# Altium PCB BluesClues.PcbDoc
Units mil, origin at the board's own origin, x right, y up, seen from the top; angles counter-clockwise.
Board outline 4000 x 4000 mil, 2 copper layers (Top Layer, Bottom Layer); 33 components, 32 nets, 131 pads, 212 vias.
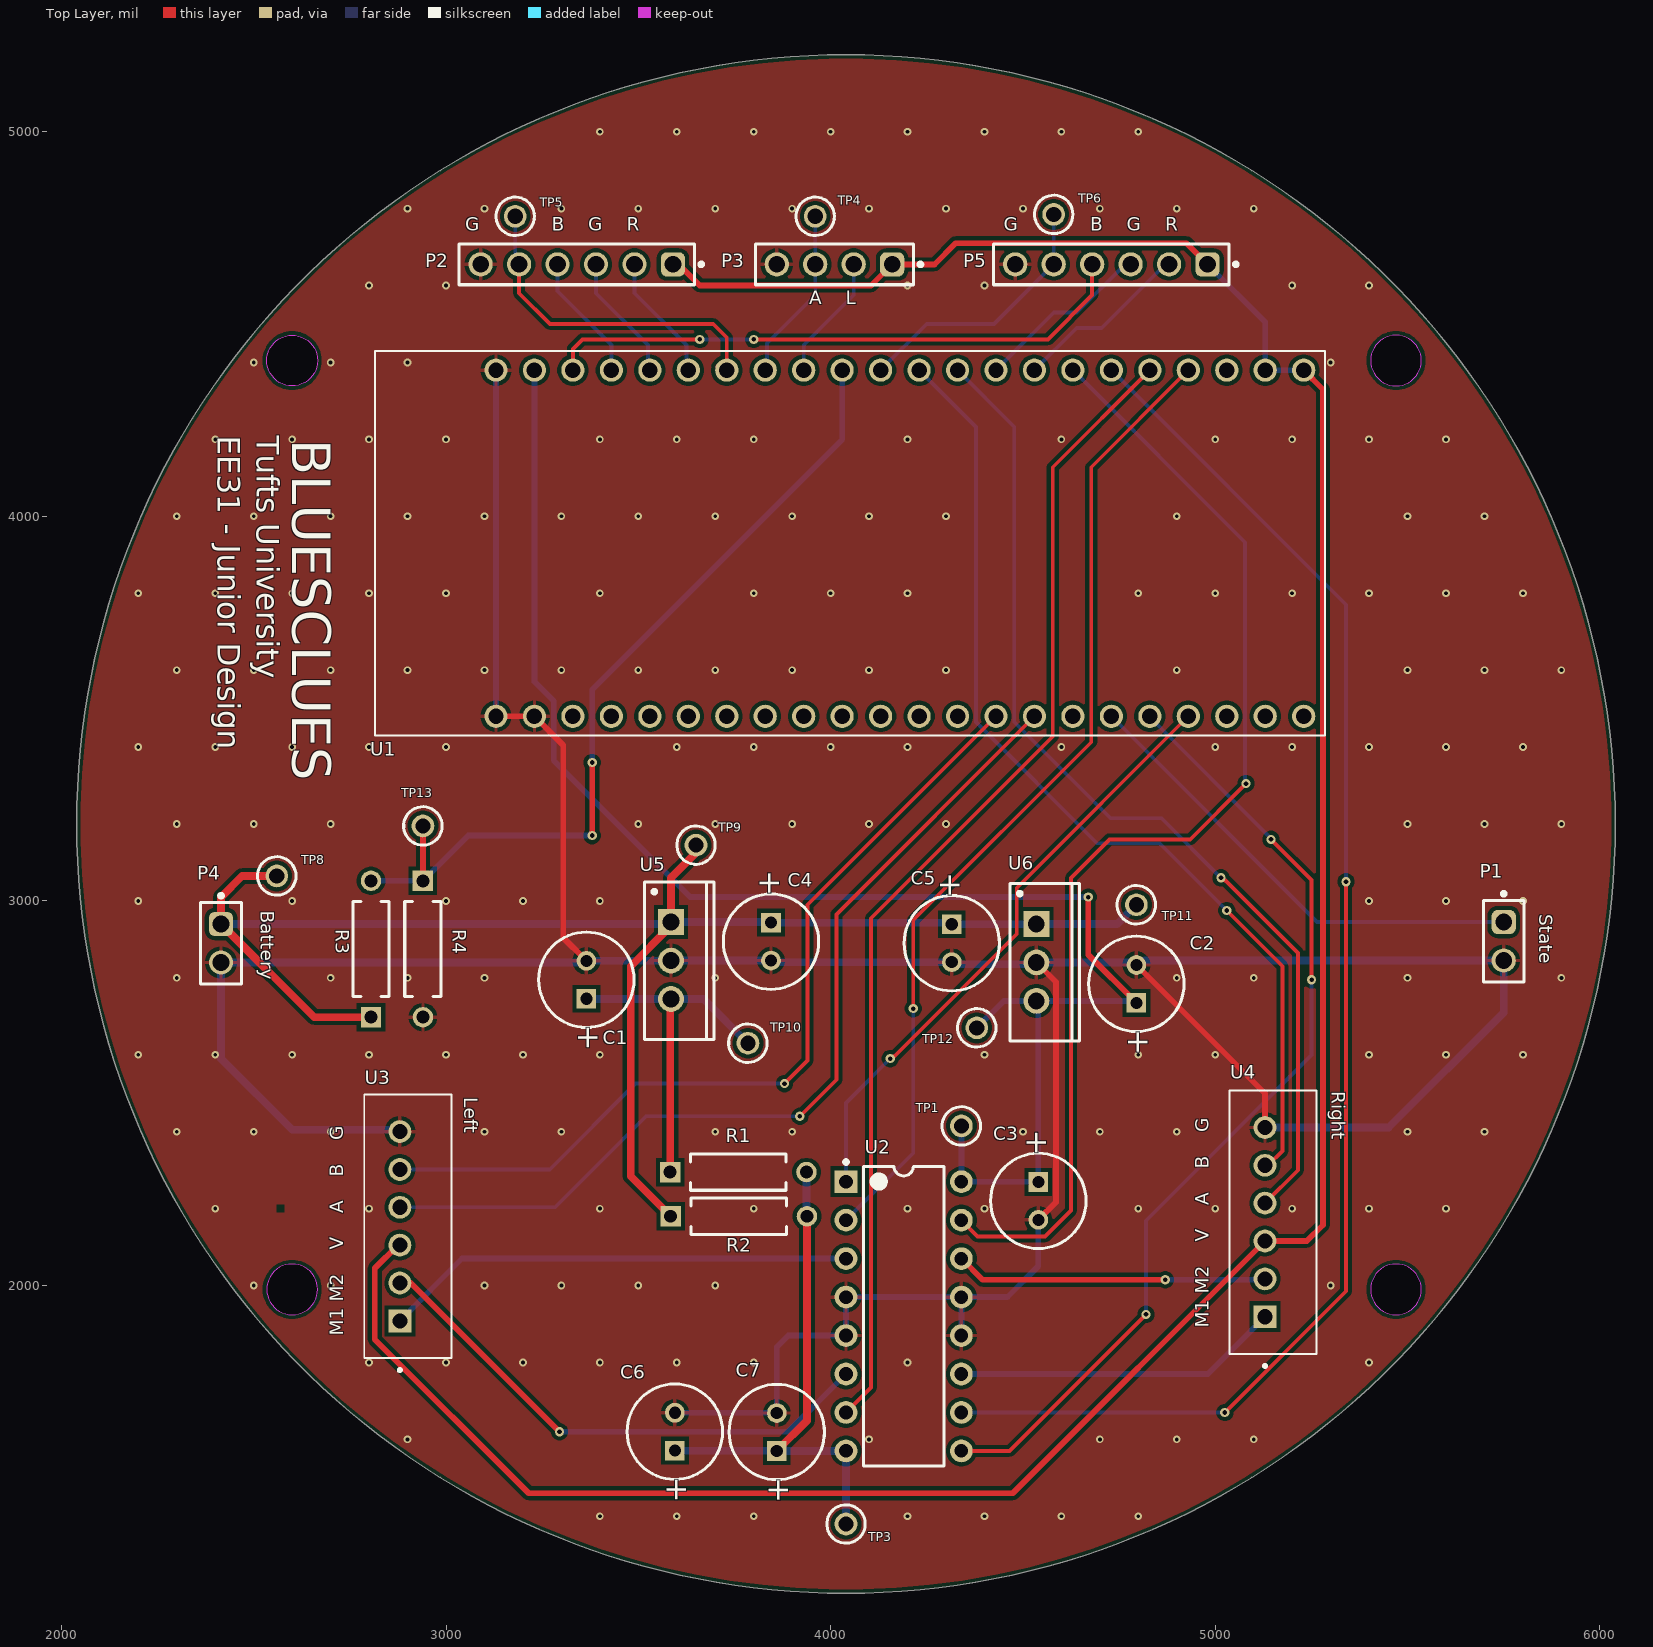
[diagram p0: Top Layer view]
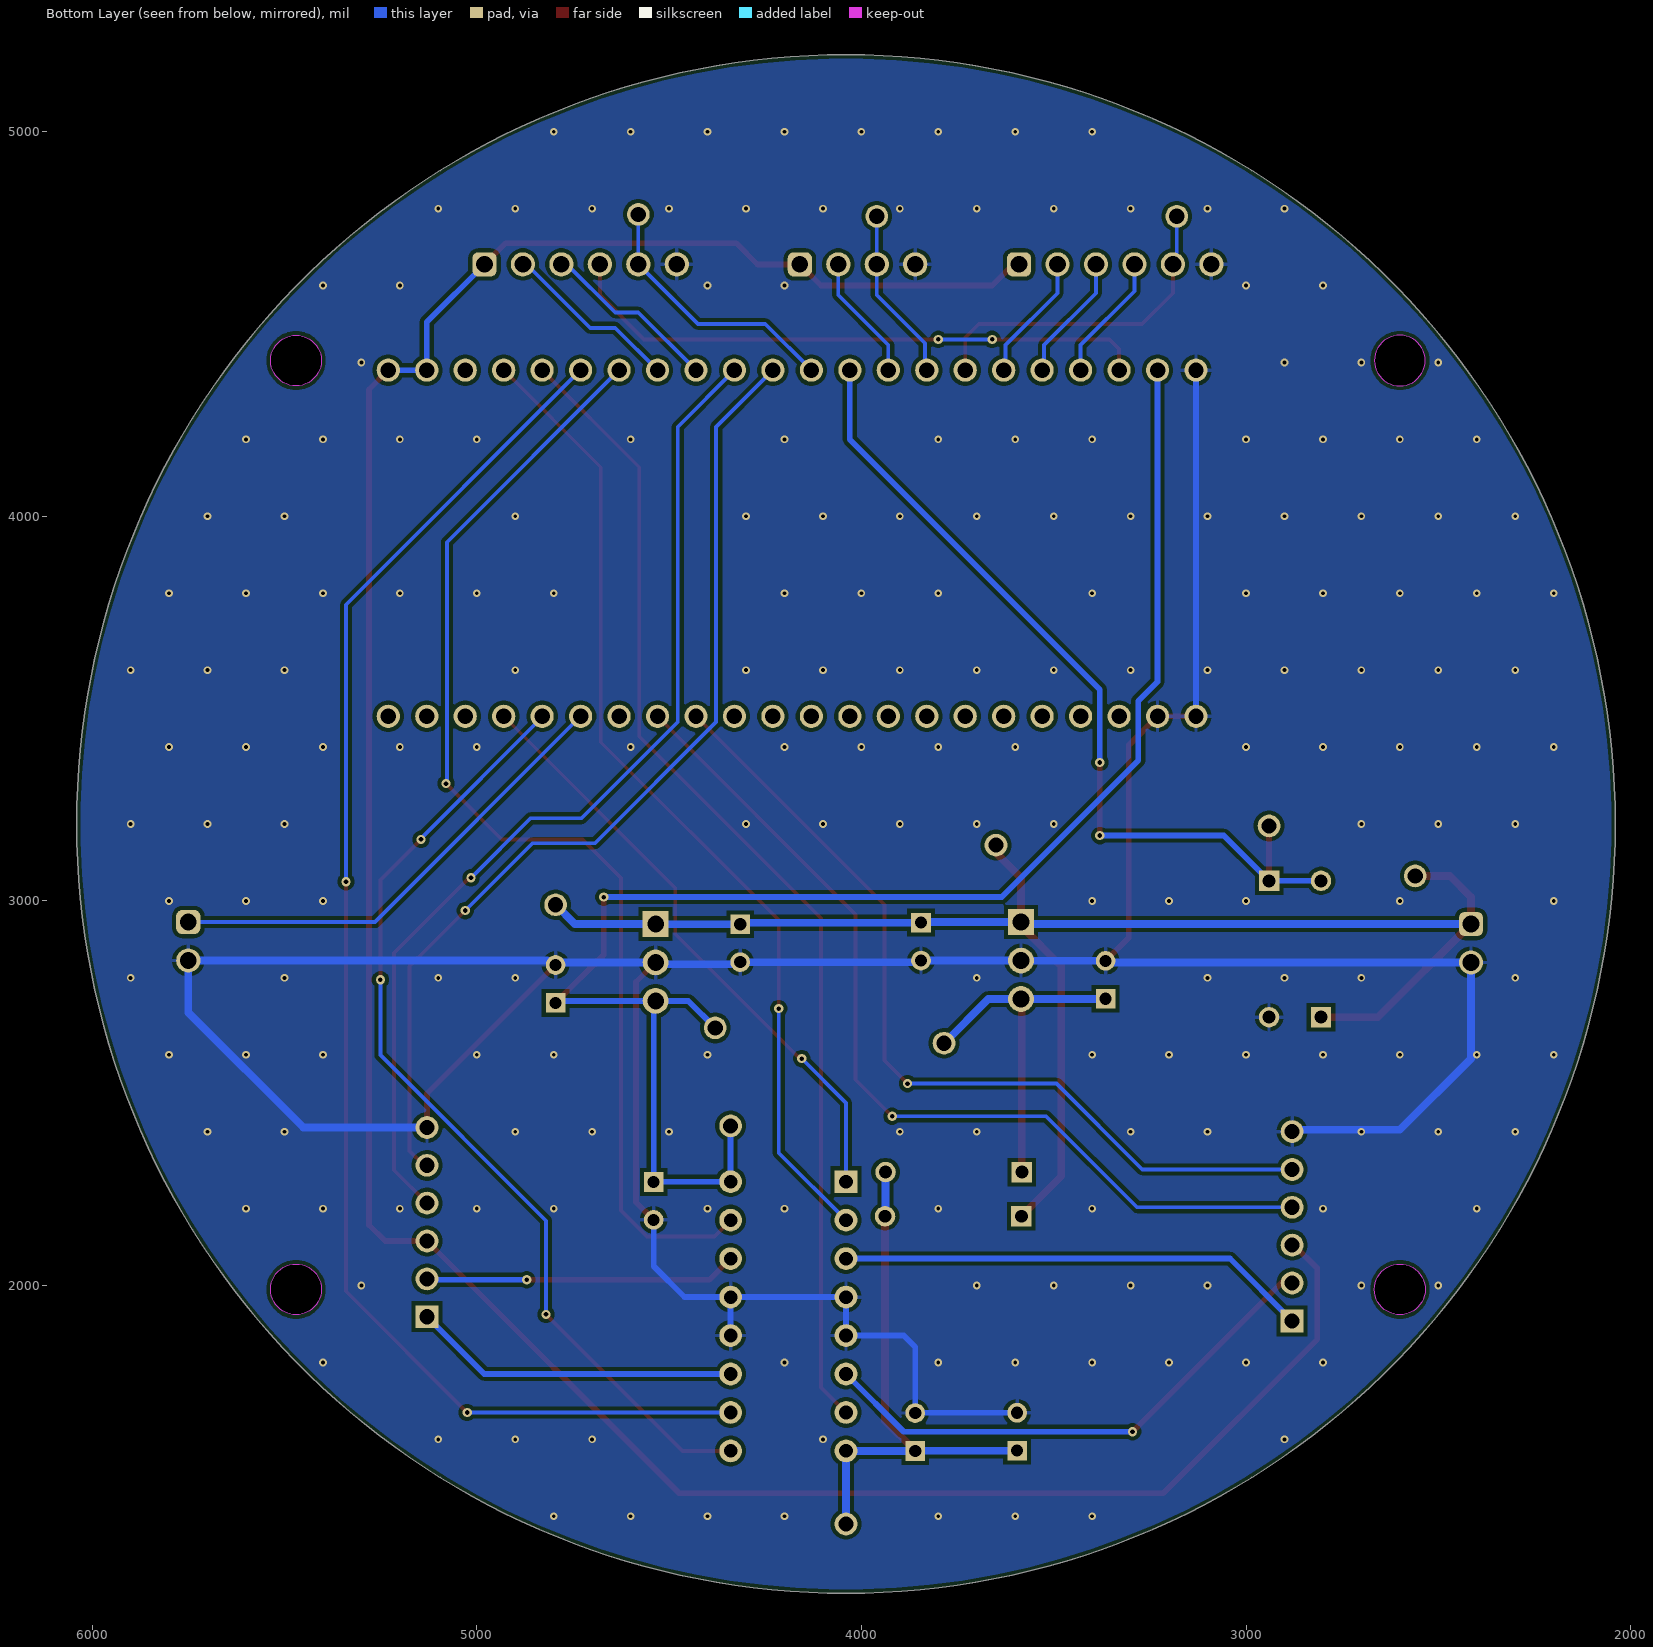
[diagram p1: Bottom Layer view, seen from below]
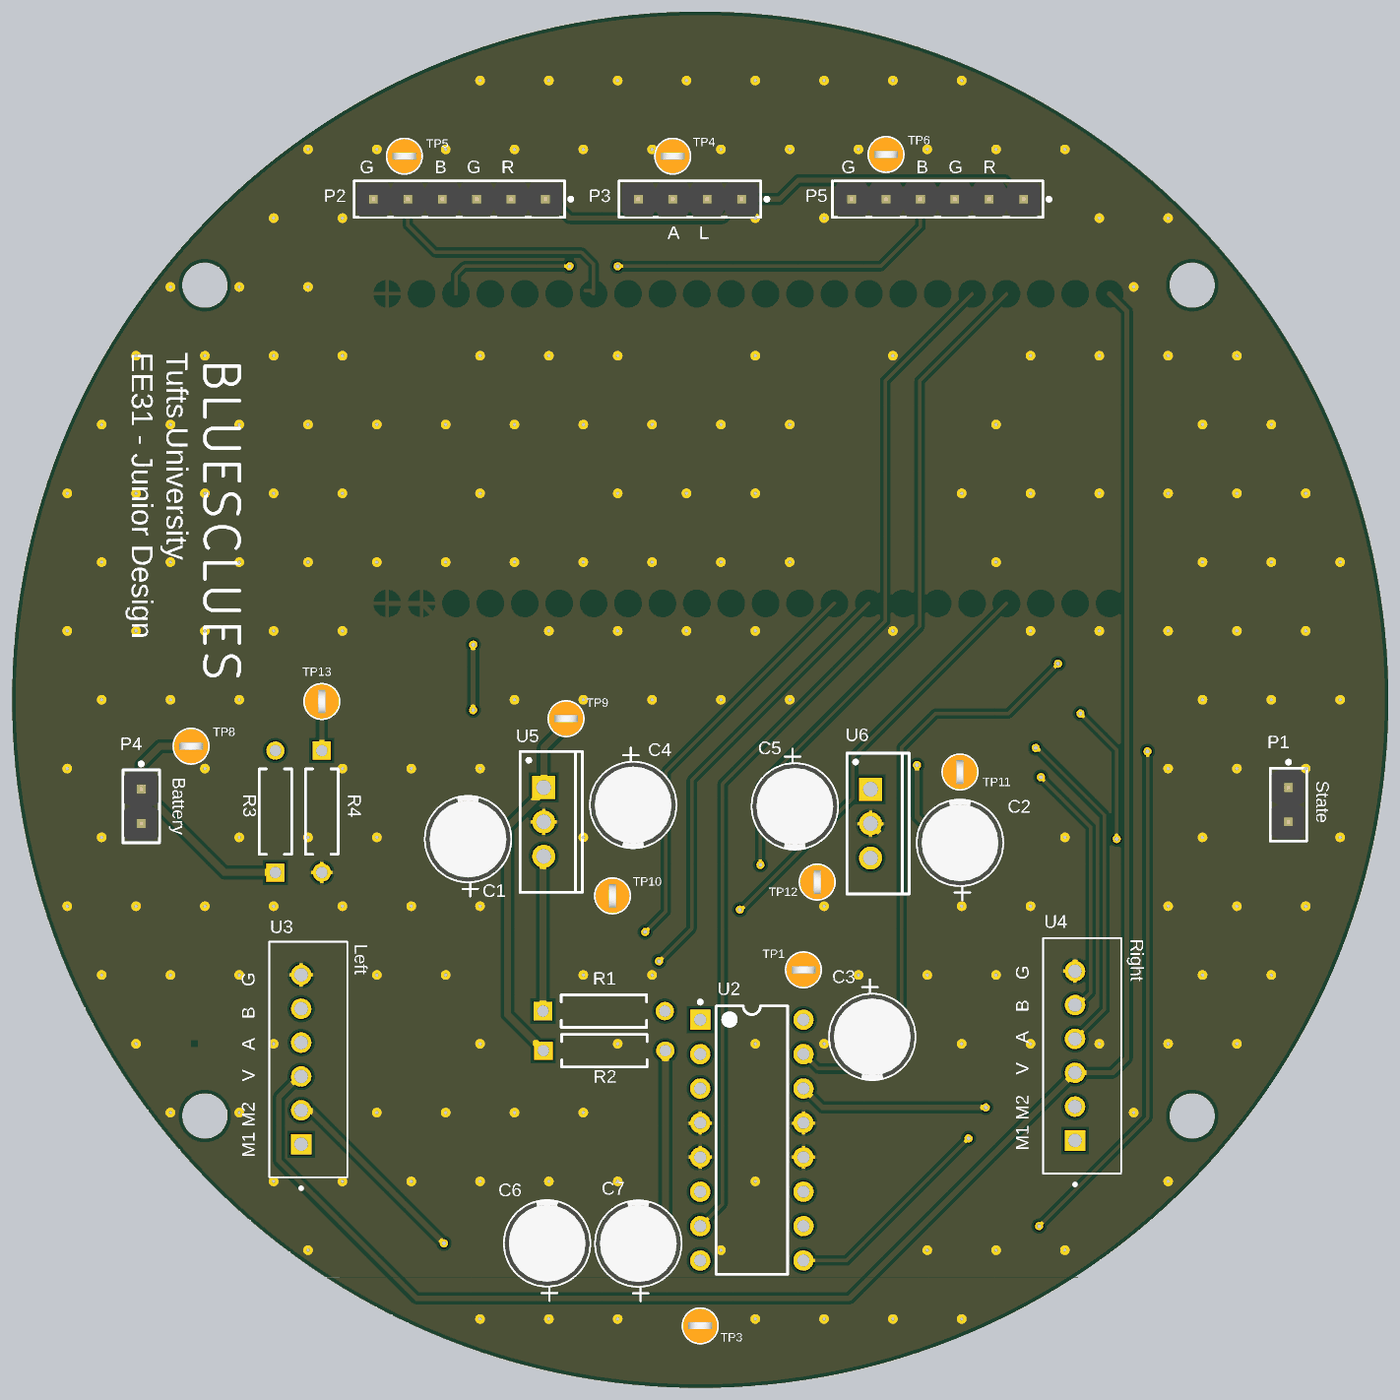
[diagram p2: 3D render of the assembled board from above, using the file's embedded part models]

## Layer stack, top to bottom
Top Solder: solder mask 0.4, Solder Resist, Dk 3.5
Top Layer: signal copper 1.4
Dielectric 1: dielectric 12.6, FR-4, Dk 4.8
Bottom Layer: signal copper 1.4
Bottom Solder: solder mask 0.4, Solder Resist, Dk 3.5

## Board outline
2040,3200 ccw(c4040,3200) 4040,1200 ccw(c4040,3200) 6040,3200 ccw(c4040,3200) 4040,5200 ccw(c4040,3200)
cut-out: 5404,1990 ccw(c5470,1990) 5470,1924 ccw(c5470,1990) 5536,1990 ccw(c5470,1990) 5470,2056 ccw(c5470,1990)
cut-out: 5404,4405 ccw(c5470,4405) 5470,4339 ccw(c5470,4405) 5536,4405 ccw(c5470,4405) 5470,4471 ccw(c5470,4405)
cut-out: 2534,1990 ccw(c2600,1990) 2600,1924 ccw(c2600,1990) 2666,1990 ccw(c2600,1990) 2600,2056 ccw(c2600,1990)
cut-out: 2600,4339 cw(c2600,4405) 2534,4405 cw(c2600,4405) 2600,4471 cw(c2600,4405) 2666,4405 cw(c2600,4405)

## Design rules (kind name [scope] priority, off if disabled: settings)
BoardOutlineClearance [All] p1: gap=10 ignorepadtopadclearanceinfootprint=FALSE except(0: Arc-SplitContinuation Track-SplitContinuation SMDPad-SplitContinuation THPad-SplitContinuation Via-SplitContinuation Fill-SplitContinuation Poly-SplitContinuation Region-SplitContinuation Text-SplitContinuation)
Clearance "Stitching GND" [IsStitchingVia and InNet('GND') vs (IsVia and (Not IsStitchingVia)) Or IsPad] p1: gap=50 ignorepadtopadclearanceinfootprint=FALSE
Clearance [All] p2: gap=10 ignorepadtopadclearanceinfootprint=FALSE
PolygonConnect PolygonConnect_1 [IsPad] p1: connectstyle=Relief reliefconductorwidth=10 reliefentries=4 polygonreliefangle="90 Angle" airgapwidth=10
PolygonConnect [IsVia] p2: connectstyle=Direct reliefconductorwidth=10 reliefentries=4 polygonreliefangle="90 Angle" airgapwidth=10
RoutingVias [All] p1: holewidth=28 width=50 viastyle="Through Hole" minholewidth=28 minwidth=50 maxholewidth=28 maxwidth=50
SolderMaskExpansion [All] p1: expansion=4 istentingtop=FALSE
SupplyNets "Schematic Supply Nets_4" [InNet('3V3')] p1: voltage=0.000
SupplyNets "Schematic Supply Nets_3" [InNet('5V_2')] p2: voltage=0.000
SupplyNets "Schematic Supply Nets_2" [InNet('5V_1')] p3: voltage=0.000
SupplyNets "Schematic Supply Nets_1" [InNet('VCC')] p4: voltage=0.000
SupplyNets "Schematic Supply Nets" [InNet('GND')] p5: voltage=0.000
Width [All] p1: maxlimit=20 minlimit=6 preferedwidth=10
30 further rules are at their usual default settings.

## Components (designator, comment, footprint, x,y, rotation, side; value= is the part's Value field where it differs from the comment)
C1 "100uF 25VDC" CAPPR55-250-1120X630X1220 3365,2795 r90 top value="100nF 50VDC"
C2 "100uF 25VDC" CAPPR55-250-1120X630X1220 4795,2784.21 r90 top value="100nF 50VDC"
C3 "100uF 25VDC" CAPPR55-250-1120X630X1220 4540,2220 r270 top value="100nF 50VDC"
C4 "330nF 50V" CAPPR55-250-1120X630X1220 3845,2894.21 r270 top
C5 "330nF 50V" CAPPR55-250-1120X630X1220 4315,2890 r270 top
C6 "100uF 25VDC" CAPPR55-250-1120X630X1220 3595,1620 r90 top
C7 "100uF 25VDC" CAPPR55-250-1120X630X1220 3860,1619.21 r90 top value="100nF 50VDC"
P1 "Button" 61300211121 5750,2895 r270 top
P2 "Color_sensor" 61300611121 3340,4655 r180 top
P3 "Dist_Sensor" 61300411121 4010,4655 r180 top
P4 "Battery_Connector" 61300211121 2415,2890 r270 top
P5 "Color_sensor" 61300611121 4730,4655 r180 top
R1 "MFR-25FBF52-22K1" RESA60-630X240 3760,2295 r0 top value=0Ohm
R2 "MFR-25FBF52-22K1" RESA60-630X240 3761.34,2180 r0 top value=0Ohm
R3 "MFR-25FBF52-22K1" RESA60-630X240 2805,2875 r90 top value=0Ohm
R4 "MFR-25FBF52-22K1" RESA60-630X240 2940,2875 r270 top value=0Ohm
TP1 "5003" KSTN-5003 4340,2415 r0 top
TP3 "5003" KSTN-5003 4040,1380 r0 top
TP4 "5003" KSTN-5003 3960,4780 r0 top
TP5 "5003" KSTN-5003 3180,4780 r0 top
TP6 "5003" KSTN-5003 4580,4785 r0 top
TP8 "5003" KSTN-5003 2560,3065 r0 top
TP9 "5003" KSTN-5003 3650,3145 r0 top
TP10 "5003" KSTN-5003 3785,2630 r90 top
TP11 "5003" KSTN-5003 4795,2990 r90 top
TP12 "5003" KSTN-5003 4380,2670 r90 top
TP13 "5003" KSTN-5003 2940,3195 r90 top
U1 "ESP32-S3-DEVKITC-1U-N8R8" MODULE_ESP32-S3-DEVKITC-1U-N8R8 3915.08,-685 r270 top
U2 "L293DNE" NE0016A 4190,1920 r0 top
U3 "1523-POLOLU" JST_B6B-XH-A 2900.67,2154.21 r270 top
U4 "1523-POLOLU" JST_B6B-XH-A 5150,2165 r270 top
U5 "L7805CV" TO220 3585,2845 r270 top
U6 "L7805CV" TO220 4535,2840 r270 top

## Footprints (in the part's own frame and the unit in brackets; to place one, negate y for a bottom-side part, rotate by r counter-clockwise, add the part's x,y. Pads: shape width x height; smd on the part's side, far side on the other; paste and mask are expansions set on the pad)
61300211121 [mm] "Pin Header, pitch 2.54 mm, THT, Vertical, single row, 2p"
  rrect50% 1.6x1.6 hole 1.1: 1(-1.27,0)
  round 1.6 hole 1.1: 2(1.27,0)
  silkscreen extent -3.26,-1.35 2.69,1.35, body extent -2.54,-1.27 2.54,1.27, height 8.57
61300411121 [mm]
  rrect50% 1.6x1.6 hole 1.1: 1(-3.81,0)
  round 1.6 hole 1.1: 2(-1.27,0) 3(1.27,0) 4(3.81,0)
  silkscreen extent -5.8,-1.35 5.23,1.35, body extent -5.08,-1.27 5.08,1.27, height 8.57
61300611121 [mm] "Pin Header, pitch 2.54 mm, THT, Vertical, single row, 6p"
  rrect50% 1.6x1.6 hole 1.1: 1(-6.35,0)
  round 1.6 hole 1.1: 2(-3.81,0) 3(-1.27,0) 4(1.27,0) 5(3.81,0) 6(6.35,0)
  silkscreen extent -8.34,-1.35 7.77,1.35, body extent -7.62,-1.27 7.62,1.27, height 8.57
CAPPR55-250-1120X630X1220 [mm] "THD, 2-Leads, Dia 6.3mm, Pin Spacing 2.5mm"
  rect 1.3x1.3 hole 0.8: 1(-1.25,0)
  round 1.3 hole 0.8: 2(1.25,0)
  silkscreen extent -3.15,-3.15 3.15,3.15, body extent -3.15,-3.15 3.16,3.15, height 12.21
JST_B6B-XH-A [mm]
  rect 1.508x1.508 / inner round 1.508 / far side rect 1.508x1.508 hole 1: 1(6.25,-0.525)
  round 1.508 hole 1: 2(3.75,-0.525) 3(1.25,-0.525) 4(-1.25,-0.525) 5(-3.75,-0.525) 6(-6.25,-0.525)
  silkscreen extent -8.7,-2.88 9.6,2.88
KSTN-5003 [mm] "Test Point, Through Hole, Dia 2.54mm"
  round 1.5 hole 1: 1(0,0)
  silkscreen extent -1.27,-1.27 1.27,1.27, body extent -1.27,-1.27 1.27,1.27, height 4.57
MODULE_ESP32-S3-DEVKITC-1U-N8R8 [mm]
  round 1.53 hole 1.02 mask+0.102: J1_1(-128.651,33.399) J1_2(-128.651,30.859) J1_3(-128.651,28.319) J1_4(-128.651,25.779) J1_5(-128.651,23.239) J1_6(-128.651,20.699) J1_7(-128.651,18.159) J1_8(-128.651,15.619) J1_9(-128.651,13.079) J1_10(-128.651,10.539) J1_11(-128.651,7.999) J1_12(-128.651,5.459) J1_13(-128.651,2.919) J1_14(-128.651,0.379) J1_15(-128.651,-2.161) J1_16(-128.651,-4.701) J1_17(-128.651,-7.241) J1_18(-128.651,-9.781) J1_19(-128.651,-12.321) J1_20(-128.651,-14.861) J1_21(-128.651,-17.401) J1_22(-128.651,-19.941) J3_1(-105.791,33.399) J3_2(-105.791,30.859) J3_3(-105.791,28.319) J3_4(-105.791,25.779) J3_5(-105.791,23.239) J3_6(-105.791,20.699) J3_7(-105.791,18.159) J3_8(-105.791,15.619) J3_9(-105.791,13.079) J3_10(-105.791,10.539) J3_11(-105.791,7.999) J3_12(-105.791,5.459) J3_13(-105.791,2.919) J3_14(-105.791,0.379) J3_15(-105.791,-2.161) J3_16(-105.791,-4.701) J3_17(-105.791,-7.241) J3_18(-105.791,-9.781) J3_19(-105.791,-12.321) J3_20(-105.791,-14.861) J3_21(-105.791,-17.401) J3_22(-105.791,-19.941)
  silkscreen extent -129.92,-27.94 -104.52,34.8, body extent -129.92,-28.53 -104.52,34.8, height 7.49
NE0016A [mm] "DIP, 16-Leads, Body 19.8x6.6mm, Pitch 2.54mm, Row Spacing 7.62mm"
  rect 1.5x1.5 hole 0.9: 1(-3.81,8.89)
  round 1.5 hole 0.9: 2(-3.81,6.35) 3(-3.81,3.81) 4(-3.81,1.27) 5(-3.81,-1.27) 6(-3.81,-3.81) 7(-3.81,-6.35) 8(-3.81,-8.89) 9(3.81,-8.89) 10(3.81,-6.35) 11(3.81,-3.81) 12(3.81,-1.27) 13(3.81,1.27) 14(3.81,3.81) 15(3.81,6.35) 16(3.81,8.89)
  silkscreen extent -3.93,-9.9 2.65,10.31, body extent -3.95,-9.9 3.95,9.9, height 5.08
RESA60-630X240 [mm] "Axial Resistor, 2-Leads, Dia 2.4mm, Body Length 6.3mm"
  rect 1.35x1.35 hole 0.85: 1(-4.5,0)
  round 1.35 hole 0.85: 2(4.5,0)
  silkscreen extent -3.15,-1.2 3.15,1.2, body extent -4.77,-1.19 4.77,1.2, height 2.4
TO220 [mm] "TO, Thru-Hole, Vertical, Heatsink Mounted; 3 In-Line Leads; Pitch 2.54 mm"
  rect 1.7x1.7 hole 1.1: 1(-2.54,0)
  round 1.7 hole 1.1: 2(0,0) 3(2.54,0)
  silkscreen extent -5.2,-1.75 5.2,2.85, body extent -5.25,-1.8 5.25,2.9, height 19.7

## Part data
C1 C2 C3 C4 C5 C6 C7: library part CMP-001-00030-5, "Aluminum Electrolytic Capacitor, 47 uF, +/- 20%, 50 V, -40 to 85 degC, 2-Pin THD, RoHS, Bulk", Capacitor Type=Electrolytic, Case/Package=Radial, Manufacturer=Panasonic, Max Operating Temperature=85°C, Min Operating Temperature=-40°C, Package Description="2-Pin Radial Lead, Dia 6.3 mm, Height 12.2 mm", Package Quantity=200, Package Reference=CAPPR55-250-1120X630X1220, Ripple Current=130mA, Tolerance=20%, Voltage Rating=50V, Datasheet URL=https://industrial.panasonic.com/cdbs/www-data/pdf/RDF0000/ABA0000C1218.pdf, Datasheet Version="Rev. 05, 10/2016", Diameter=6.3mm, Lead Pitch=2.5mm, Manufacturer URL=http://www.panasonic.com/, Mounting Technology=TH, Packaging=Bulk, Pins=2, Ripple Current (AC)=130mA, RoHS Compliant=True
P1 P4: library part CMP-1712-00002-7, "THT Vertical Pin Header WR-PHD, Pitch 2.54 mm, Single Row, 2 pins", Color=Black, Contact Resistance=20mΩ, Current Rating=3A, Max Operating Temperature=105°C, Min Operating Temperature=-40°C, Operating Supply Voltage=250V, Connector Type="Male Pin", Contact Gender=Male, Contact Material=Gold, Contact Mating Length=5.9944mm, Contact Plating=Gold, Gender=Male, Height=8.94mm, Housing Material=PBT, Lead Free="Lead Free", Lead Pitch=2.54mm, Mount="Through Hole", Number of Contacts=2, Number of Pins=2, Number of Positions=2, Number of Rows=1, Orientation=Vertical, Packaging=Bulk, Pitch=2.54mm, REACH SVHC=No, RoHS=Compliant, Termination="Through Hole", Voltage Rating=250V
P2 P5: library part CMP-1502-01070-4, "THT Vertical Pin Header WR-PHD, Pitch 2.54 mm, Single Row, 6 pins", Color=Black, Contact Resistance=20mΩ, Current Rating=3A, Max Operating Temperature=105°C, Min Operating Temperature=-40°C, Operating Supply Voltage=250V, Connector Type="Male Pin", Contact Gender=Male, Contact Material=Gold, Contact Mating Length=5.9944mm, Contact Plating=Gold, Gender=Male, Height=8.89mm, Housing Material=PBT, Lead Free="Lead Free", Lead Pitch=2.54mm, Mount="Through Hole", Number of Contacts=6, Number of Pins=6, Number of Positions=6, Number of Rows=1, Orientation=Vertical, Packaging=Bulk, Pitch=2.54mm, RoHS=Compliant, Termination="Through Hole", Voltage Rating=250V
P3: library part CMP-002-00088-1, "CONN HEADER VERT 4POS 2.54MM", Case/Package="Through Hole", Color=Black, Contact Resistance=20mΩ, Current Rating=3A, Manufacturer="Würth Elektronik", Max Operating Temperature=105°C, Min Operating Temperature=-40°C, Operating Supply Voltage=250V, Part Number=61300411121, Connector Type="Male Pin", Contact Material=Copper, Contact Mating Length=5.9944mm, Contact Plating=Gold, ContentHash=0220F8311916AC9FAC57190B782E2ACB, Design Item ID=61300411121, Gender=Male, Height=8.89mm, Lead Free="Lead Free", Lead Pitch=2.54mm, Mount="Through Hole", Mounting Technology="Through Hole", NexarCadSource="Wurth Elektronik", NexarCadSourceId=3913, NexarPartId=32855522, Number of Contacts=4, Number of Positions=4, Number of Rows=1, Orientation=Vertical, Packaging=Bulk, Pins=4, Pitch=2.54mm, REACH SVHC=Unknown, RoHS=Compliant, Source=FIR_Board_DS.SCHLIB, Termination=Solder, Voltage Rating=250V
R1 R2 R3 R4: library part CMP-009-00052-3, "Axial Resistor, 22.1 KOhm, +/- 1%, 0.25 W, -55 to 155 degC, 2-Pin THD, RoHS, Bulk", Case/Package=Axial, Manufacturer=Yageo, Max Operating Temperature=155°C, Min Operating Temperature=-55°C, Package Description="2-Pin Axial Lead, Dia 2.4 mm, Body Length 6.3 mm", Package Quantity=200, Package Reference=MFR-25, Power=250mW, Tolerance=1%, Voltage Rating=250V, Datasheet URL=http://www.yageo.com/documents/recent/Yageo%20LR_MFR_2013.pdf, Datasheet Version=Apr-13, Manufacturer URL=http://www.yageo.com/, Mounting Technology=TH, Packaging=Bulk, RoHS Compliant=True
TP1 TP3 TP4 TP5 TP6 TP8 TP9 TP10 TP11 TP12 TP13: library part CMP-002-00037-1, "Test Point, Orange, Height 4.6 mm, Tail Length 3 mm, 1-Pin THD, RoHS", Colour=Orange, Manufacturer=Keystone, Package Description="1-Pin Through Hole Device, Dia 2.54 mm", Package Quantity=10, Case/Package=5003, Connector Type=TestPoint, Contact Material=Bronze, Contact Plating=Tin, Datasheet URL=http://keyelco.com/userAssets/file/M65p56.pdf, Datasheet Version=Jun-15, Diameter=2.54mm, Manufacturer URL=http://www.keyelco.com/, Mounting Technology=TH, Package Reference=5003, Packaging=Bulk, Pins=1, RoHS Compliant=True
U1: "The ESP32-S3-DEVKITC-1U-N8R8 from Espressif Systems is an evaluation board designed for wireless communication applications. It features a 32-bit Xtensa dual-core processor running at 240MHz, providing strong processing power for complex tasks. The board", Package=None, Check_prices=https://www.snapeda.com/parts/ESP32-S3-DEVKITC-1U-N8R8/Espressif+Systems/view-part/?ref=eda, MF="Espressif Systems", MP=ESP32-S3-DEVKITC-1U-N8R8, SnapEDA_Link=https://www.snapeda.com/parts/ESP32-S3-DEVKITC-1U-N8R8/Espressif+Systems/view-part/?ref=snap
U2: library part CMP-019-00017-2, "Quadruple Half-H Driver, 1.2 A Peak, 4.5 to 36 V, 0 to 70 degC, 16-Pin DIP (NE), Pb-Free (RoHS), Tube", Case/Package=DIP, Manufacturer="Texas Instruments", Max Operating Temperature=70°C, Max Supply Voltage=36V, Min Operating Temperature=0°C, Min Supply Voltage=4.5V, Output Current=600mA, Package Description="16-Pin Through Hole Device, Body 19.8 x 6.35 mm, Pitch 2.54 mm, Row Spacing 7.62 mm", Package Quantity=25, Package Reference=NE0016A, Package Version="4040054/B, 04/1995", Datasheet URL=http://www.ti.com/general/docs/lit/getliterature.tsp?genericPartNumber=l293d&fileType=pdf, Datasheet Version="SLRS008D, 01/2016", Interface=Parallel, Manufacturer URL=http://www.ti.com/, Mounting Technology=TH, Output Voltage=36V, Outputs=4, Package URL=http://www.ti.com/lit/ml/mpdi003/mpdi003.pdf, Packaging=Rail/Tube, Pins=16, RoHS Compliant=True
U3 U4: library part CMP-00028-00007-3, "Magnetic Encoder Pair Kit for Mini Plastic Gearmotors, 12 CPR, 2.7-18V"
U5 U6: library part CMP-0244-00483-1, "Positive Voltage Regulator, 5V, 3-Pin TO-220", ComponentLink1Description="Manufacturer URL", ComponentLink1URL=http://www.st.com, ComponentLink2Description=Datasheet, ComponentLink2URL=http://www.st.com/internet/com/TECHNICAL_RESOURCES/TECHNICAL_LITERATURE/DATASHEET/CD00000444.pdf, ComponentLink3Description="Package Specification", ComponentLink3URL=http://www.st.com/internet/com/TECHNICAL_RESOURCES/TECHNICAL_LITERATURE/PACKAGE_INFORMATION/CD00004649.pdf, DatasheetVersion=16/11/2011, PackageDescription="TO, Thru-Hole, Vertical, Heatsink Mounted; 3 In-Line Leads; Pitch 2.54 mm", PackageReference=TO220, PackageVersion=ver3.0

## Via types
v1: diameter 20, hole 10, Top Layer to Bottom Layer, 193 vias
v2: diameter 24, hole 12, Top Layer to Bottom Layer, 19 vias

## Nets (pads, with @x,y where several pads share a name; then routed paths per layer and width w, separated by ;. In a path a pad name is that pad's centre, name@x,y a point inside that pad or via, vN(x,y) a via of type N, cw(c..) or ccw(c..) an arc to the next point about the centre after c; other vN are vias at no path point)
3V3: P2.1 P3.1 P5.1 U1.J1_1 U1.J1_2 U3.3 U4.3 | length 7350.8
  Top Layer w15: U3.3@2875,2105 2815,2045 2815,1860 3215,1460 4473.54,1460 U4.3 5238.04,2115.79 5280,2157.74 5280,4330 U1.J1_1 ; P2.1 3605,4655 3660,4600 4105,4600 P3.1 4270,4655 4325,4710 4925,4710 P5.1
  Bottom Layer w15: P5.1 5130,4505 U1.J1_2 U1.J1_1
5V_1: C2.1 C3.1 TP1.1 TP12.1 U1.J1_21 U2.16 U6.3 | length 4155.9
  Top Layer w15: v2(4670,3010) 4670,2860 C2.1
  Bottom Layer w15: U1.J1_21 3230,3570 3280,3520 3280,3365 3635,3010 v2(4670,3010) ; TP1.1 U2.16 4539.21,2270 C3.1 ; TP12.1 4450,2740 U6.3 ; C3.1@4540,2270 4540,2735 U6.3 ; C2.1@4790,2740 U6.3
5V_2: C1.1 R1.1 TP10.1 U5.3 | length 915.5
  Top Layer w20: R1.1 U5.3@3582.83,2742.83
  Bottom Layer w20: C1.1@3365,2745 U5.3 3670,2745 TP10.1
BLINK1_B: P2.4 U1.J1_19 | length 333
  Bottom Layer w10: P2.4 3290,4585 3430,4445 U1.J1_19
BLINK1_G: P2.3 U1.J1_18 | length 325.9
  Bottom Layer w10: P2.3 3390,4580 3525,4445 U1.J1_18@3525,4385
BLINK1_R: P2.2 U1.J1_17 | length 325.9
  Bottom Layer w10: P2.2 3490,4580 3625,4445 U1.J1_17@3625,4385
BLINK2_B: P5.4 U1.J1_20 | length 1543
  Top Layer w10: U1.J1_20 3330,4435 3355,4460 v2(3660,4460) ; v2(3800,4460) 4565,4460 4680,4575 P5.4
  Bottom Layer w10: v2(3660,4460) v2(3800,4460)
BLINK2_G: P5.3 U1.J1_9 | length 463.9
  Bottom Layer w10: U1.J1_9 4580,4530 4640,4530 4765,4655 P5.3
BLINK2_R: P5.2 U1.J1_8 | length 463.9
  Bottom Layer w10: U1.J1_8 4640,4490 4705,4490 4870,4655 P5.2
BMS: R3.2 R4.1 TP13.1 U1.J1_13 | length 2245.9
  Top Layer w15: R4.1 TP13.1 ; v2(3380,3170) v2(3380,3360)
  Bottom Layer w15: R3.2 R4.1 3057.83,3170 v2(3380,3170) ; v2(3380,3360) 3380,3549.69 4030,4199.69 U1.J1_13
COLOR1_ADC: P2.5 TP5.1 U1.J1_16 | length 891.2
  Top Layer w10: P2.5 3190,4580 3270,4500 3695,4500 3730,4465 U1.J1_16 3720.39,4389.61 U1.J1_16@3705.39,4389.61
  Bottom Layer w10: P2.5@3180,4665 TP5.1
COLOR2_ADC: P5.5 TP6.1 U1.J1_12 | length 693
  Bottom Layer w10: U1.J1_12 4250,4500 4425,4500 P5.5@4579.36,4654.36 ; P5.5 TP6.1
DIST_ADC: P3.3 TP4.1 U1.J1_15 | length 446.8
  Bottom Layer w10: U1.J1_15@3835,4385 3835,4450 3960,4575 P3.3 TP4.1
GND: C1.2 C2.2 C3.2 C4.2 C5.2 C6.2 C7.2 P1.2 P2.6 P3.4 P4.2 P5.6 R4.2 U1.J1_22 U1.J3_21 U1.J3_22 U2.4 U2.5 U2.12 U2.13 U3.6 U4.6 U5.2 U6.2 | length 9420.1
  Top Layer w15: U1.J3_22 U1.J3_21 3305,3405 3305,2904.21 C1.2@3359.21,2850 ; U6.2 4585.96,2789.04 4585.96,2216.75 C3.2 ; C2.2 5129.33,2499.09 U4.6
  Bottom Layer w15: U1.J3_22 U1.J1_22 ; C6.2 C7.2@3859.21,1669.21 ; C7.2 3860,1840 3890,1870 U2.5 U2.4 U2.13 ; U2.12 U2.13 ; C3.2 4540,2050 4460,1970 U2.13
  Bottom Layer w20: U3.6@2875.28,2405 2600,2405 2415,2590 P4.2 C1.2@3360.79,2840 ; C1.2 U5.2@3584.21,2844.21 ; U5.2 C4.2@3855,2845 ; C4.2@3849.21,2840.79 C5.2 ; C5.2@4320,2835 U6.2@4530,2835 ; U6.2 C2.2@4788.43,2840 ; C2.2 4804.79,2833.43 4816.37,2845 5727.83,2845 5738.43,2834.41 P1.2@5738.43,2833.43 ; U4.6 5451.06,2411.06 5750,2710 P1.2
  other v1: 3400,1400 3600,1400 3800,1400 4200,1400 4400,1400 4600,1400 4800,1400 2900,1600 4100,1600 4700,1600 4900,1600 5100,1600 2800,1800 3000,1800 3200,1800 3400,1800 3600,1800 3800,1800 4200,1800 5400,1800 2500,2000 2700,2000 3100,2000 3300,2000 3500,2000 3700,2000 5300,2000 2400,2200 2800,2200 3400,2200 3800,2200 4200,2200 4400,2200 4800,2200 5000,2200 5200,2200 5400,2200 5600,2200 2300,2400 2500,2400 2700,2400 3100,2400 3300,2400 3700,2400 3900,2400 4500,2400 4700,2400 4900,2400 5500,2400 5700,2400 2200,2600 2400,2600 2600,2600 2800,2600 3000,2600 3200,2600 3400,2600 4400,2600 4800,2600 5000,2600 5400,2600 5600,2600 5800,2600 2300,2800 2700,2800 2900,2800 3100,2800 3700,2800 4900,2800 5100,2800 5500,2800 5900,2800 2200,3000 2600,3000 3000,3000 3200,3000 3400,3000 5400,3000 5600,3000 5800,3000 2300,3200 2500,3200 2700,3200 3500,3200 3700,3200 3900,3200 4100,3200 4300,3200 5500,3200 5700,3200 5900,3200 2200,3400 2400,3400 2600,3400 2800,3400 3000,3400 3600,3400 3800,3400 4000,3400 4200,3400 4600,3400 5000,3400 5200,3400 5400,3400 5600,3400 5800,3400 2300,3600 2500,3600 2700,3600 2900,3600 3100,3600 3300,3600 3500,3600 3700,3600 3900,3600 4100,3600 4300,3600 4900,3600 5500,3600 5700,3600 5900,3600 2200,3800 2400,3800 2600,3800 2800,3800 3000,3800 3400,3800 3800,3800 4000,3800 4200,3800 4800,3800 5000,3800 5200,3800 5400,3800 5600,3800 5800,3800 2300,4000 2500,4000 2700,4000 2900,4000 3100,4000 3300,4000 3500,4000 3700,4000 3900,4000 4100,4000 4300,4000 4900,4000 5500,4000 5700,4000 2400,4200 2600,4200 2800,4200 3000,4200 3400,4200 3600,4200 3800,4200 4200,4200 4600,4200 5000,4200 5200,4200 5400,4200 5600,4200 2500,4400 2700,4400 2900,4400 5300,4400 2800,4600 3000,4600 4200,4600 4400,4600 5200,4600 5400,4600 2900,4800 3100,4800 3300,4800 3500,4800 3700,4800 3900,4800 4100,4800 4300,4800 4500,4800 4700,4800 4900,4800 5100,4800 3400,5000 3600,5000 3800,5000 4000,5000 4200,5000 4400,5000 4600,5000 4800,5000
LED_IR: P3.2 U1.J1_14 | length 328.8
  Bottom Layer w10: U1.J1_14 3930,4445 4060,4575 P3.2
LEFT_DIR1: U1.J1_4 U2.2 | length 2578.7
  Top Layer w10: v2(4215,2720) 4215,2950 4677.62,3412.62 4677.62,4127.62 U1.J1_4
  Bottom Layer w10: U2.2 4215,2345 v2(4215,2720)
LEFT_DIR2: U1.J1_5 U2.7 | length 3037.2
  Top Layer w10: U2.7 4105,1735 4105,2955 4577.62,3427.62 4577.62,4127.62 U1.J1_5
LEFT_ENC_A: U1.J3_8 U3.4 | length 2430.7
  Top Layer w10: v2(3920,2440) 4015,2535 4015,2965 U1.J3_8
  Bottom Layer w10: U3.4 3282.98,2203.43 3519.56,2440 v2(3920,2440)
LEFT_ENC_B: U1.J3_9 U3.5 | length 2275.2
  Top Layer w10: v2(3880,2525) 3940,2585 3940,2990 U1.J3_9
  Bottom Layer w10: U3.5 3269.69,2301.85 3492.84,2525 v2(3880,2525)
LEFT_PWM: U1.J3_4 U2.1 | length 1581.6
  Top Layer w10: v2(4155,2590) 4158.79,2590 4165.38,2596.59 4166.59,2596.59 4484.04,2914.04 4484.04,3034.04 U1.J3_4
  Bottom Layer w10: U2.1 4040,2475 v2(4155,2590)
NetC6_1: C6.1 C7.1 R1.2 R2.2 TP3.1 U2.8 | length 1390.4
  Top Layer w20: C7.1 3938.5,1648.5 R2.2
  Bottom Layer w20: C6.1 C7.1@3859.21,1570.79 ; C7.1 U2.8 TP3.1 ; R2.2@3937.17,2181.34 R1.2
NetU2_3: U2.3 U3.1 | length 1227
  Bottom Layer w15: U3.1 3041.85,2070 U2.3
NetU2_6: U2.6 U3.2 | length 1382.3
  Top Layer w15: U3.2 2908.43,2006.57 v2(3295,1620)
  Bottom Layer w15: v2(3295,1620) 3890,1620 U2.6
NetU2_11: U2.11 U4.1 | length 851
  Bottom Layer w15: U2.11 4980.39,1770 U4.1
NetU2_14: U2.14 U4.2 | length 813.1
  Top Layer w15: U2.14 4395,2015 v2(4870,2015)
  Bottom Layer w15: v2(4870,2015) 5126.97,2015 U4.2
RIGHT_DIR1: U1.J1_6 U2.10 | length 3778.1
  Top Layer w10: v2(5025,1670) 5340,1985 v2(5340,3050)
  Bottom Layer w10: U2.10 v2(5025,1670) ; U1.J1_6 5340,3770 v2(5340,3050)
RIGHT_DIR2: U1.J1_7 U2.15 | length 3006.5
  Top Layer w10: U2.15 4382.3,2127.7 4557.85,2127.7 4625,2194.85 4625,3060 4725,3160 4935,3160 v2@5077.5,3302.5
  Bottom Layer w10: U1.J1_7 5077.62,3932.38 v2@5077.62,3307.38
  other v2: 5080,3305
RIGHT_ENC_A: U1.J1_10 U4.4 | length 2644
  Top Layer w10: v2@5020,3060 5020,3058.79 5025.38,3053.41 5026.59,3053.41 5215,2865 5215,2299.88 U4.4
  Bottom Layer w10: U1.J1_10 4477.62,4232.38 4477.62,3465.04 4727.66,3215 4860,3215 v2(5015,3060)
RIGHT_ENC_B: U1.J1_11 U4.5 | length 2577.7
  Top Layer w10: v2(5030,2975) 5175,2830 5175,2350 5137.64,2312.64 U4.5
  Bottom Layer w10: U1.J1_11 4377.62,4232.38 4377.62,3465.04 4692.66,3150 4855,3150 v2(5030,2975)
RIGHT_PWM: U1.J3_5 U2.9 | length 2534.5
  Top Layer w10: U2.9 4465,1570 v2(4820,1925) ; v2(5145,3160) 5250.5,3054.5 v2(5250.5,2795)
  Bottom Layer w10: v2(4820,1925) 4820,2168.46 5250.5,2598.96 v2(5250.5,2795) ; U1.J3_5 4830,3477.5 5145,3162.5 v2(5145,3160)
State: P1.1 U1.J3_6 | length 1241.6
  Bottom Layer w10: U1.J3_6 5265,2945 P1.1
VCC: C4.1 C5.1 P4.1 R2.1 R3.1 TP8.1 TP9.1 TP11.1 U5.1 U6.1 | length 4167.4
  Top Layer w20: TP8.1 2470,3065 2415,3010 P4.1 2657.17,2697.83 R3.1 ; R2.1 3480,2284.17 3480,2830 U5.1@3585,2935 ; U5.1 3585,3060 3650,3125 TP9.1
  Bottom Layer w20: P4.1 U5.1@3565,2940 ; U5.1 C4.1@3840,2945 ; C4.1 C5.1@4310.79,2943.43 ; C5.1 U6.1@4534.21,2939.21 ; U6.1 4745,2940 TP11.1
pads on no net: U1.J1_3 U1.J3_1 U1.J3_2 U1.J3_3 U1.J3_7 U1.J3_10 U1.J3_11 U1.J3_12 U1.J3_13 U1.J3_14 U1.J3_15 U1.J3_16 U1.J3_17 U1.J3_18 U1.J3_19 U1.J3_20

## Polygon pours and split planes (outlines as drawn)
GND on Bottom Layer "GND_L02_P001" (solid, pour order 1): 1705,5325 1775,5255 6370,5255 6370,750 6365,745 6235,875 1545,875 1545,5155 1735,5345
GND on Top Layer "GND_L01_P000" (solid, pour order 0): 4955,5210 4880,5285 2700,5285 2700,5260 1620,4180 1620,2225 1635,2225 3000,860 5365,860 6540,2035 6540,3905

## Other copper
Top Layer:

## Silkscreen, mask and mechanical layers (free items; w line width, h text height)
Top Overlay:
  text "G            B    G    R" at 3050,4730.65 h60
  text "G            B    G    R" at 4450,4730.65 h60
  text "A    L" at 3944.95,4540 h60
  text "EE31 - Junior Design" at 2387.64,4210 h100 r270
  text "Tufts University" at 2488.74,4210 h100 r270
  text "BLUESCLUES" at 2600,4200 h100 r270
  text "Battery" at 2506.25,2975 h60 r270
  text "State" at 5830.65,2965 h60 r270
  text "Right" at 5291.25,2505 h60 r270
  text "Left" at 3035.6,2490 h60 r270
  text "M1 M2    V    A    B    G" at 4994.35,1890 h60 r90
  text "M1 M2    V    A    B    G" at 2744.35,1870 h60 r90
Mechanical 1:
  circle w10: c4040,3200 r2000

## Text inside footprints (layer, text, board x,y; h text height)
C1: Top Overlay "+" at 3394.53,2609.97 h59.06 r90
C2: Top Overlay "+" at 4824.53,2599.19 h59.06 r90
C3: Top Overlay "+" at 4510.47,2405.03 h59.06 r270
C4: Top Overlay "+" at 3815.47,3079.24 h59.06 r270
C5: Top Overlay "+" at 4285.47,3075.03 h59.06 r270
C6: Top Overlay "+" at 3624.53,1434.97 h59.06 r90
C7: Top Overlay "+" at 3889.53,1434.19 h59.06 r90
U1: Mechanical 13 "J3" at 5211.5,3605.2 h50 r270; Mechanical 13 "J1" at 5211.5,4323.7 h50 r270